# Altium PCB AmplificadorNMOS.PcbDoc
Units mm, origin at the board's own origin, x right, y up, seen from the top; angles counter-clockwise.
Board outline 100 x 100 mm, 2 copper layers (Top Layer, Bottom Layer); 21 components, 9 nets, 40 pads, 0 vias.
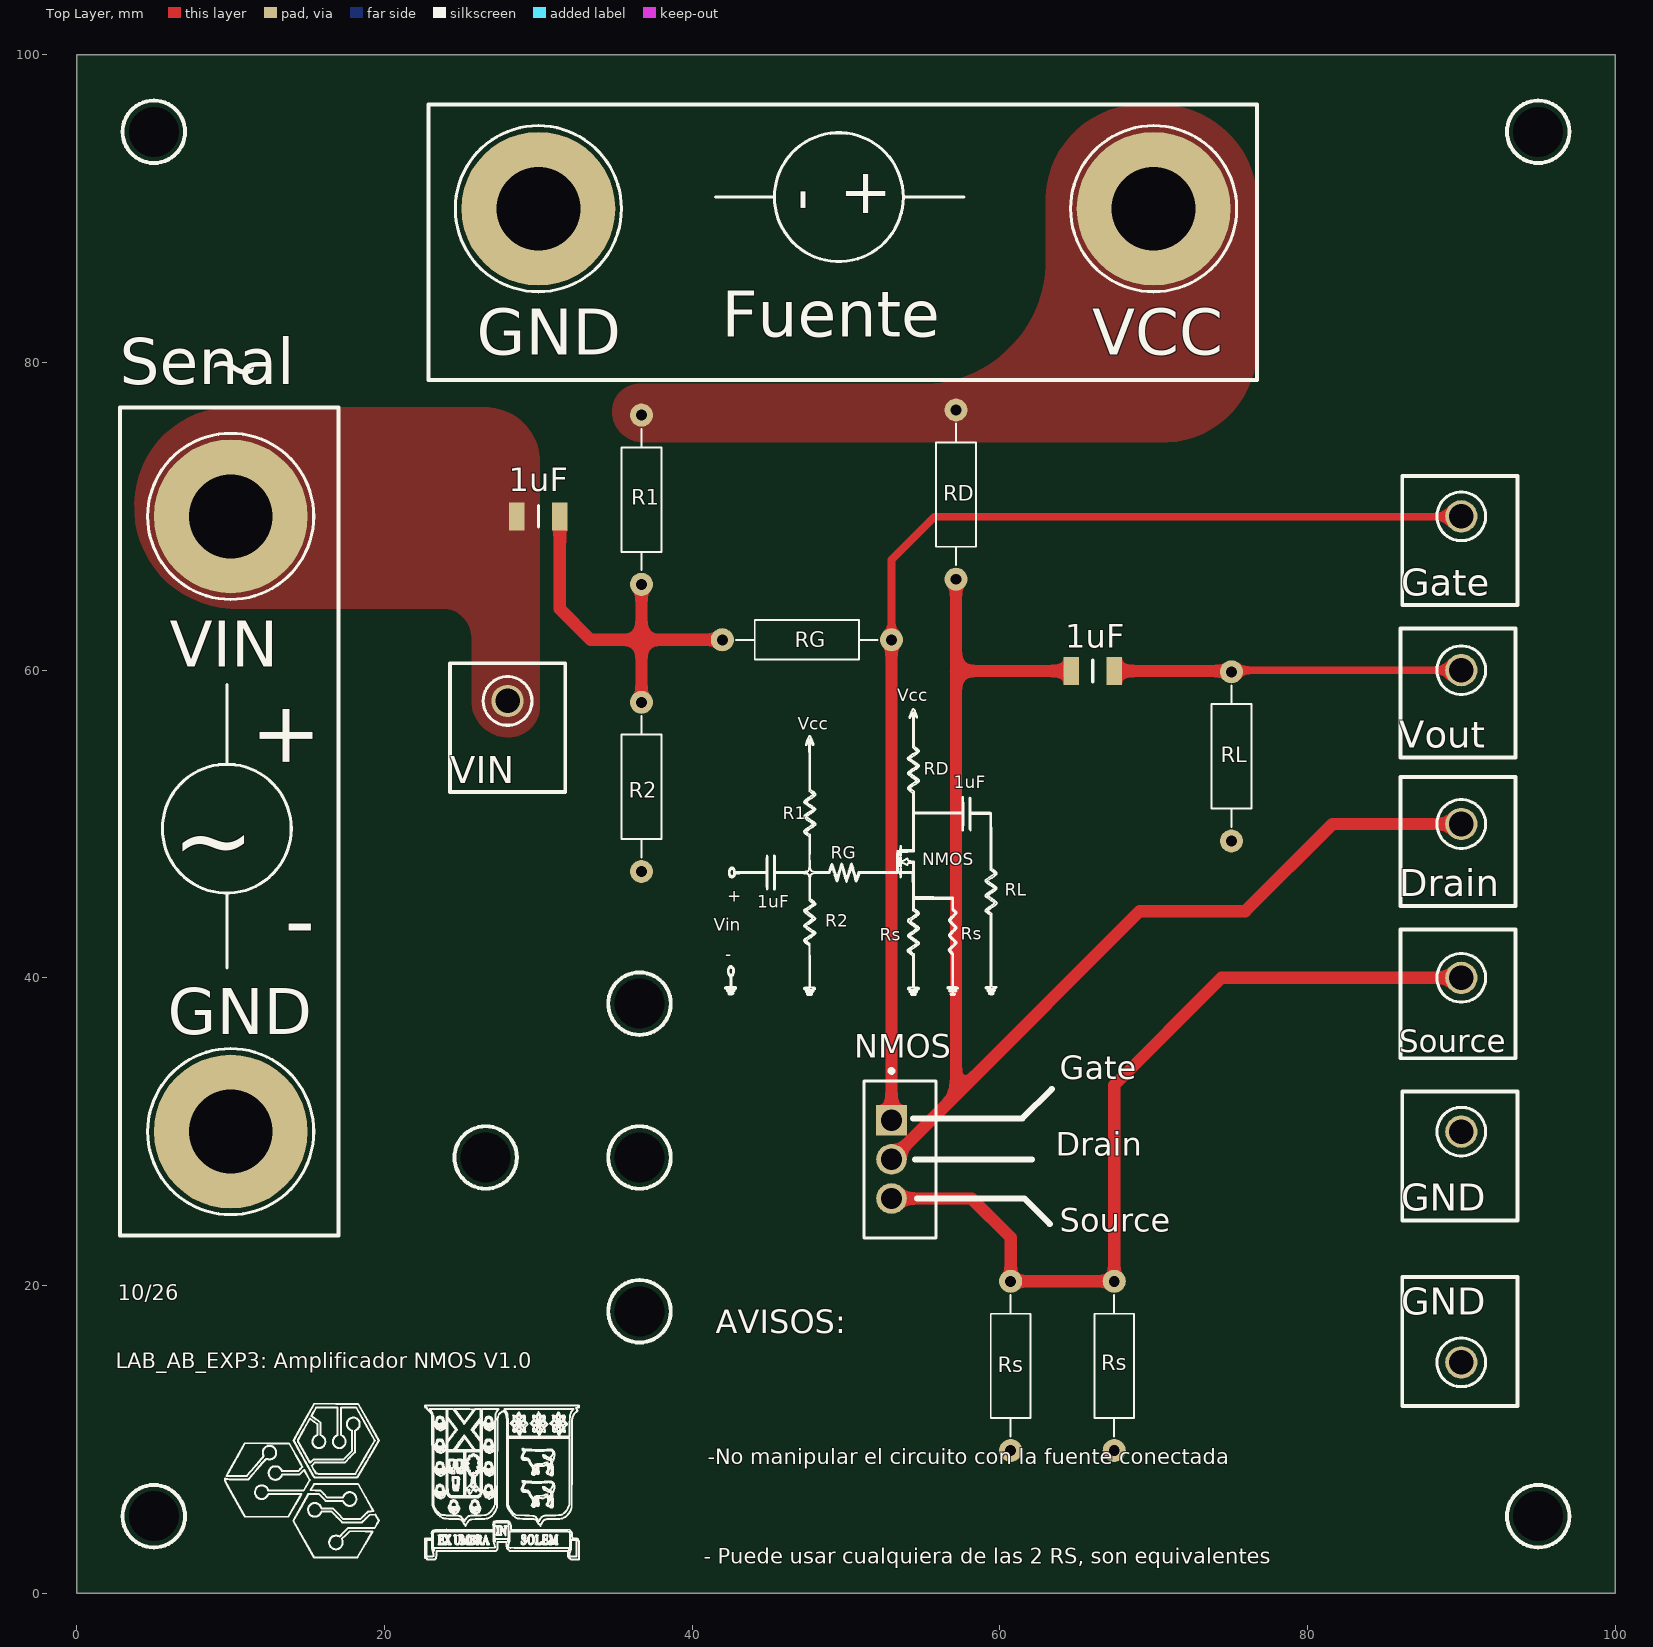
[diagram p0: Top Layer view]
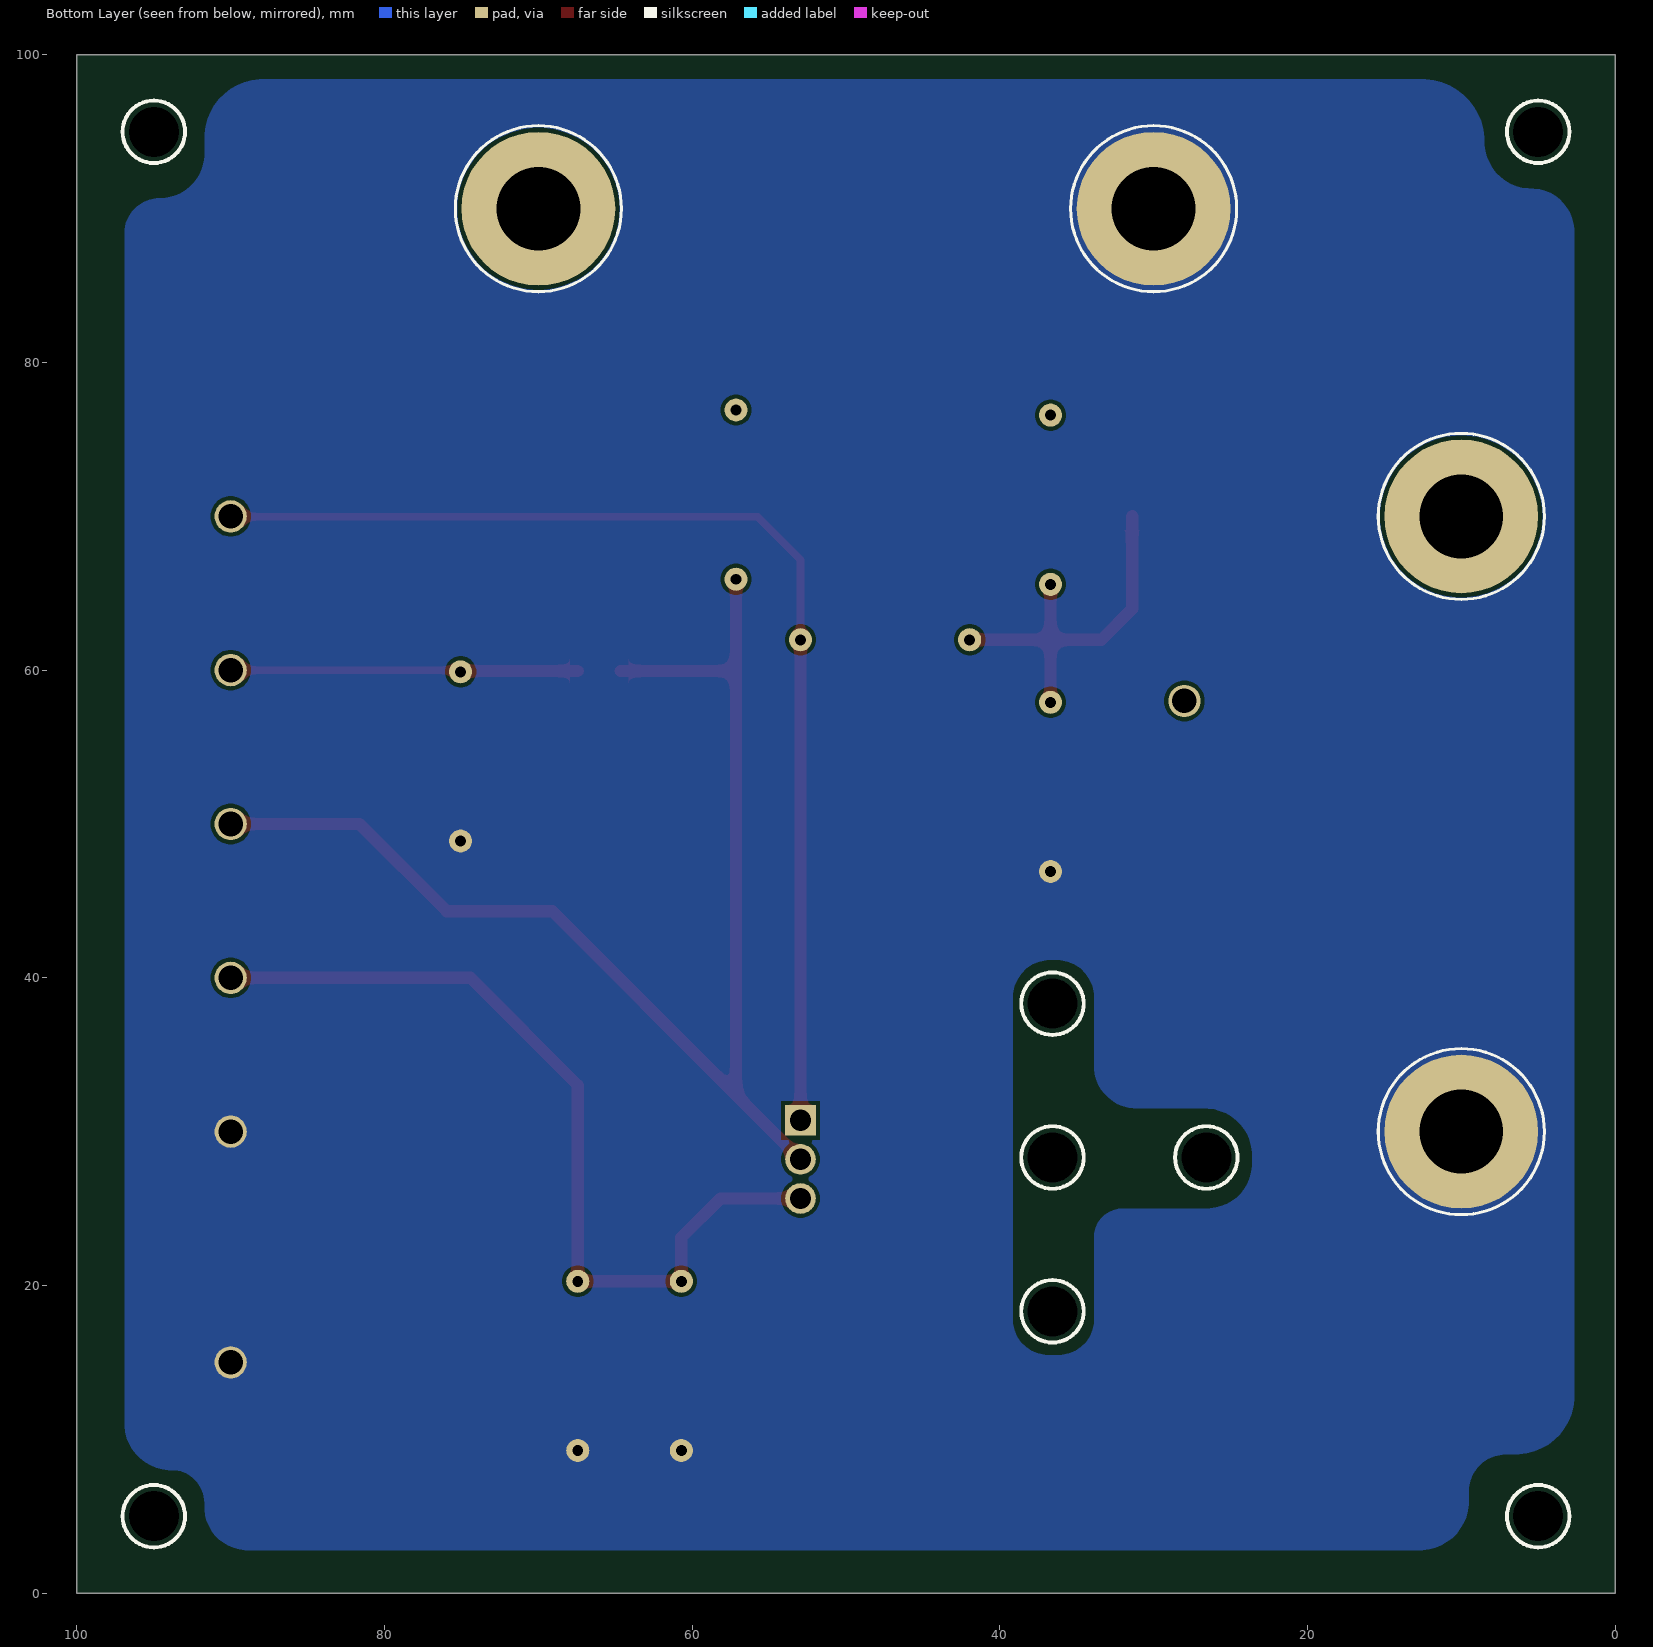
[diagram p1: Bottom Layer view, seen from below]

## Layer stack, top to bottom
Top Solder: solder mask 0.0102, Solder Resist, Dk 3.5
Top Layer: signal copper 0.0356
Dielectric 1: dielectric 0.32, FR-4, Dk 4.8
Bottom Layer: signal copper 0.0356
Bottom Solder: solder mask 0.0102, Solder Resist, Dk 3.5

## Board outline
0,0 100,0 100,100 0,100

## Design rules (kind name [scope] priority, off if disabled: settings)
Clearance [All] p1: gap=0.254 ignorepadtopadclearanceinfootprint=FALSE
PolygonConnect [All] p1: connectstyle=Direct reliefconductorwidth=0.254 reliefentries=4 polygonreliefangle="90 Angle" airgapwidth=0.254
RoutingVias [All] p1: holewidth=0.711 width=1.27 viastyle="Through Hole" minholewidth=0.711 minwidth=1.27 maxholewidth=0.711 maxwidth=1.27
SolderMaskExpansion [All] p1: expansion=0 istentingtop=FALSE
SupplyNets "Schematic Supply Nets_2" [InNet('+VAC')] p1: voltage=0.000
SupplyNets "Schematic Supply Nets_1" [InNet('GND')] p2: voltage=0.000
SupplyNets "Schematic Supply Nets" [InNet('VCC')] p3: voltage=0.000
Width [All] p1: maxlimit=0.254 minlimit=0.254 preferedwidth=0.254
30 further rules are at their usual default settings.

## Components (designator, comment, footprint, x,y, rotation, side; value= is the part's Value field where it differs from the comment)
1uF "C1206C105K3RAC7800" CAPC3216X140N 66.04,59.944 r0 top (schematic designator C5)
1uF "C1206C105K3RAC7800" CAPC3216X140N 30,70 r0 top locked (schematic designator C4)
Drain "5012" KSTN-5012_V 90,50 r270 top locked (schematic designator TP33)
Gate "5014" KSTN-5014_V 90,70 r270 top locked (schematic designator TP34)
GND "5011" KSTN-5011_V 90,30 r270 top locked (schematic designator TP50)
GND "5011" KSTN-5011_V 90,15 r270 top locked (schematic designator TP36)
GND "575-4" KSTN-575-4 30,90 r0 top locked (schematic designator TP30)
GND "575-4" KSTN-575-4 10,30 r0 top locked (schematic designator TP28)
NMOS "IRLZ44N" IFX-PG-TO220-3-904-1 52.959,28.194 r270 top (schematic designator Q2)
R1 "Zocalo_Resistencia_1/4W" Resistencia#1 36.703,76.581 r270 top (schematic designator R7)
R2 "Zocalo_Resistencia_1/4W" Resistencia#1 36.703,57.912 r270 top (schematic designator R3)
RD "Zocalo_Resistencia_1/4W" Resistencia#1 57.15,76.913 r270 top (schematic designator R4)
RG "Zocalo_Resistencia_1/4W" Resistencia#1 41.959,61.976 r0 top (schematic designator R1)
RL "Zocalo_Resistencia_1/4W" Resistencia#1 75.057,59.895 r270 top (schematic designator R5)
Rs "Zocalo_Resistencia_1/4W" Resistencia#1 60.706,20.271 r270 top (schematic designator R6)
Rs "Zocalo_Resistencia_1/4W" Resistencia#2 67.437,20.271 r270 top (schematic designator R2)
Source "5013" KSTN-5013_V 90,40 r270 top locked (schematic designator TP35)
VCC "575-4" KSTN-575-4 70,90 r0 top locked (schematic designator TP29)
VIN "5010" KSTN-5010_V 28,58 r0 top (schematic designator TP31)
VIN "575-4" KSTN-575-4 10,70 r0 top locked (schematic designator TP27)
Vout "5010" KSTN-5010_V 90,60 r270 top locked (schematic designator TP32)

## Footprints (in the part's own frame and the unit in brackets; to place one, negate y for a bottom-side part, rotate by r counter-clockwise, add the part's x,y. Pads: shape width x height; smd on the part's side, far side on the other; paste and mask are expansions set on the pad)
CAPC3216X140N [mm]
  rect 1.02x1.82 smd: 1(-1.4,0) 2(1.4,0)
  silkscreen extent 0,-0.7 0,0.7, body extent -1.83,-0.89 1.57,0.91, height 1.4
IFX-PG-TO220-3-904-1 [mm] "TO,flange mount,2.54 mm pitch, 3 pin, 10.16 mm L X 4.57 mm W X 20.56 mm H body"
  rect 1.99x1.99 hole 1.39 paste-2539.97 mask+0: 1(-2.54,0)
  round 1.99 hole 1.39 paste-2539.97 mask+0: 2(0,0) 3(2.54,0)
  silkscreen extent -5.87,-1.8 5.1,2.9, body extent -5.94,-19.59 5.94,0.25, height 4.41
KSTN-575-4 [mm] "Banana Jack, Non-Insulated, Dia 7.92mm"
  round 10 hole 5.45: 1(0,0)
  silkscreen extent -5.4,-5.4 5.4,5.4, body extent -3.98,-3.96 3.92,3.94, height 2.36
KSTN-5010_V [mm] "Test Point, Dia 3.17mm"
  round 2.1 hole 1.6: 1(0,0)
  silkscreen extent -1.59,-1.58 1.59,1.58, body extent -1.59,-1.59 1.59,1.59, height 8.13
KSTN-5011_V [mm] "Test Point, Dia 3.17mm"
  round 2.1 hole 1.6: 1(0,0)
  silkscreen extent -1.58,-1.59 1.58,1.59, body extent -1.59,-1.59 1.59,1.59, height 8.13
KSTN-5012_V [mm] "Test Point, Dia 3.17mm"
  round 2.1 hole 1.6: 1(0,0)
  silkscreen extent -1.58,-1.59 1.58,1.59, body extent -1.59,-1.59 1.59,1.59, height 8.13
KSTN-5013_V [mm] "Test Point, Dia 3.17mm"
  round 2.1 hole 1.6: 1(0,0)
  silkscreen extent -1.58,-1.59 1.58,1.59, body extent -1.59,-1.59 1.59,1.59, height 8.13
KSTN-5014_V [mm] "Test Point, Dia 3.17mm"
  round 2.1 hole 1.6: 1(0,0)
  silkscreen extent -1.58,-1.59 1.58,1.59, body extent -1.59,-1.59 1.59,1.59, height 8.13
Resistencia#1 [mm]
  round 1.5 hole 0.711: 1(0,0) 2(11,0)
  silkscreen extent 0.89,-1.3 10.08,1.3, body extent -1.27,-1.27 12.27,1.27, height 6.39
Resistencia#2 [mm]
  round 1.5 hole 0.711: 1(0,0) 23(11,0)
  silkscreen extent 0.89,-1.3 10.08,1.3, body extent -1.27,-1.27 12.27,1.27, height 6.39

## Part data
1uF 1uF: "Multilayer Ceramic Capacitors MLCC - SMD/SMT 25V 1uF X7R 1206 10%", Manufacturer_Name="Yageo Group", Mouser Part Number=80-C1206C105K3R7800, Datasheet Link=https://connect.kemet.com:7667/gateway/IntelliData-ComponentDocumentation/1.0/download/specsheet/C1206C105K3RACTU, Geometry.Height=1.4mm, Manufacturer_Part_Number=C1206C105K3RAC7800, Mouser Price/Stock=https://www.mouser.co.uk/ProductDetail/KEMET/C1206C105K3RAC7800?qs=9Bh1%2FLvCqWR5qBTiXKKjKA%3D%3D
Drain: library part CMP-1672-00004-4, "Test Point, White, Through Hole, RoHS, Bulk", Colour=White, Manufacturer=Keystone, Package Quantity=100, ComponentLink1Description="Manufacturer URL", ComponentLink1URL=http://www.keyelco.com/, ComponentLink2Description=Datasheet, ComponentLink2URL=http://www.keyelco.com/product-pdf.cfm?p=1321, Contact Material=Bronze, Contact Plating=Silver, DatasheetVersion="Rev. F, 12/2013", Height="8.12 mm", Length="11.3 mm", Mount="Through Hole", Mounting Technology="Through Hole", PackageDescription="1-Pin Through Hole Device, Dia 3.17 mm", PackageReference=5012, Packaging=Bulk, Pins=1, REACH SVHC="No SVHC", RoHSCompliant=true
Gate: library part CMP-1672-00006-4, "Test Point, Yellow, Through Hole, RoHS, Bulk", Colour=Yellow, Manufacturer=Keystone, Package Quantity=100, ComponentLink1Description="Manufacturer URL", ComponentLink1URL=http://www.keyelco.com/, ComponentLink2Description=Datasheet, ComponentLink2URL=http://www.keyelco.com/product-pdf.cfm?p=1323, Contact Material=Bronze, Contact Plating=Silver, DatasheetVersion="Rev. F, 12/2013", Height="8.12 mm", Mount="Through Hole", Mounting Technology="Through Hole", PackageDescription="1-Pin Through Hole Device, Dia 3.17 mm", PackageReference=5014, Packaging=Bulk, REACH SVHC="No SVHC", RoHSCompliant=true
GND GND: library part CMP-1672-00003-4, "Test Point, Black, Through Hole, RoHS, Bulk", Colour=Black, Manufacturer=Keystone, Package Quantity=100, ComponentLink1Description="Manufacturer URL", ComponentLink1URL=http://www.keyelco.com/, ComponentLink2Description=Datasheet, ComponentLink2URL=http://www.keyelco.com/product-pdf.cfm?p=1320, Contact Material=Bronze, Contact Plating=Silver, DatasheetVersion="Rev. F, 12/2013", Height="8.12 mm", Mount="Through Hole", Mounting Technology="Through Hole", PackageDescription="1-Pin Through Hole Device, Dia 3.17 mm", PackageReference=5011, Packaging=Bulk, Pins=1, REACH SVHC="No SVHC", RoHSCompliant=true
GND GND VCC VIN: library part CMP-2000-05649-1, "Banana Jack, Non-Insulated, 1-Pin THD, RoHS, Bulk", Color=-, Manufacturer=Keystone-Electronics, Package Description="1-Pin Through Hole Device, Dia 7.92 mm", Package Version="Rev. B, 11/1994", Body Material=-, Category=Connectors,Interconnects, Contact Finish=Nickel, Contact Material=Brass, Datasheet URL=http://www.keyelco.com/product-pdf.cfm?p=2379, Datasheet Version="Rev. B, 11/1994", Family=BananaandTipConnectors-Jacks,Plugs, Features=-, Gender=Female, Insulation=Non-Insulated, Manufacturer URL=http://www.keyelco.com/, Mounting Technology=ThroughHole, Mounting Type=ThroughHole, Operating Temperature=-, Package Reference=575-4, Package URL=http://www.keyelco.com/product-pdf.cfm?p=2379, Packaging=Bulk, Plug/Mating Plug Diameter=StandardBanana, Series=-, Termination=Solder, Type=BananaJack, Wire Gauge=-
NMOS: "OptiMOS 3 Power-Transistor, VDS 100V", Manufacturer="Infineon Technologies", Manufacturer Order Number=IRLZ44N, PackageReference=PG-TO220-3-904
R1 R2 RD RG RL Rs Rs: "1.07 kOhms Â±1% 0.25W, 1/4W Through Hole Resistor Axial - Metal Film", Package="RADIAL-2 YAGEO", Check_prices=https://www.snapeda.com/parts/MFR-25FBF52-1K/Yageo/view-part/?ref=eda, MF=Yageo, MP=MFR-25FBF52-1K, SnapEDA_Link=https://www.snapeda.com/parts/MFR-25FBF52-1K/Yageo/view-part/?ref=snap
Source: library part CMP-1672-00005-4, "Test Point, Orange, Through Hole, RoHS, Bulk", Colour=Orange, Manufacturer=Keystone, Package Quantity=100, ComponentLink1Description="Manufacturer URL", ComponentLink1URL=http://www.keyelco.com/, ComponentLink2Description=Datasheet, ComponentLink2URL=http://www.keyelco.com/product-pdf.cfm?p=1322, Contact Material=Bronze, Contact Plating=Silver, DatasheetVersion="Rev. F, 12/2013", Height="8.12 mm", Mount="Through Hole", Mounting Technology="Through Hole", PackageDescription="1-Pin Through Hole Device, Dia 3.17 mm", PackageReference=5013, Packaging=Bulk, REACH SVHC="No SVHC", RoHSCompliant=True
VIN Vout: library part CMP-1672-00002-4, "Test Point, Red, Through Hole, RoHS, Bulk", Colour=Red, Manufacturer=Keystone, Package Quantity=100, ComponentLink1Description="Manufacturer URL", ComponentLink1URL=http://www.keyelco.com/, ComponentLink2Description=Datasheet, ComponentLink2URL=http://www.keyelco.com/product-pdf.cfm?p=1319, Contact Material=Bronze, Contact Plating=Silver, DatasheetVersion="Rev. F, 12/2013", Height="8.12 mm", Mount="Through Hole", Mounting Technology="Through Hole", PackageDescription="1-Pin Through Hole Device, Dia 3.17 mm", PackageReference=5010, Packaging=Bulk, Pins=1, REACH SVHC="No SVHC", RoHSCompliant=true

## Free pads (board coordinates)
  round 0 hole 3.25: 11(5,5) 11(5,95) 11(26.576,28.321) 11(36.576,18.321) 11(36.576,28.321) 11(36.576,38.321) 11(95,5) 11(95,95)

## Nets (pads, with @x,y where several pads share a name; then routed paths per layer and width w, separated by ;. In a path a pad name is that pad's centre, name@x,y a point inside that pad or via, vN(x,y) a via of type N, cw(c..) or ccw(c..) an arc to the next point about the centre after c; other vN are vias at no path point)
+VAC: 1uF.1@28.6,70 VIN.1
Center: 1uF.2@31.4,70 R1.2 R2.1 RG.1 | length 25.1
  Top Layer w0.8: 1uF.2@31.4,70 31.4,63.977 33.401,61.976 36.703,61.976 ; R2.1 36.703,61.976 ; R1.2 36.703,61.976 ; RG.1 36.703,61.976
Drain: 1uF.1@64.64,59.944 Drain.1 NMOS.2 RD.2 | length 87.1
  Top Layer w0.8: NMOS.2 57.15,32.385 ; RD.2 57.15,59.944 ; 1uF.1@64.64,59.944 57.15,59.944 ; Drain.1 81.623,50 75.946,44.323 69.088,44.323 57.15,32.385 ; 57.15,32.385 57.15,59.944
Gate: Gate.1 NMOS.1 RG.2 | length 74.6
  Top Layer w0.5: RG.2 52.959,67.183 55.753,69.977 Gate.1@90,69.977
  Top Layer w0.8: NMOS.1 RG.2
GND: GND.1 R2.2 RL.2 Rs.2 Rs.23
NetC2_1: 
Out: 1uF.2@67.44,59.944 RL.1 Vout.1 | length 22.6
  Top Layer w0.5: RL.1 75.162,60 Vout.1
  Top Layer w0.8: 1uF.2@67.44,59.944 RL.1@75.008,59.944
Source: NMOS.3 Rs.1 Source.1 | length 56.6
  Top Layer w0.8: NMOS.3 58.166,25.654 60.706,23.114 60.706,20.271 67.437,20.271 67.437,33.02 74.417,40 Source.1
VCC: R1.1 RD.1 VCC.1

## Polygon pours and split planes (outlines as drawn)
VCC on Top Layer "VCC_L01_P003" (solid, pour order 3): 70.612,74.803 36.83,74.803 cw(c36.83,76.835) 34.798,76.835 cw(c36.576,76.835) 36.576,78.613 54.991,78.613 ccw(c54.991,86.614) 62.992,86.614 62.992,90.551 cw(c69.215,90.551) 69.215,96.774 70.358,96.774 cw(c70.358,90.424) 76.708,90.424 76.708,80.899 cw(c70.612,80.899)
+VAC on Top Layer "+VAC_L01_P000" (solid, pour order 0): 10.287,64.008 23.749,64.008 cw(c23.749,62.103) 25.654,62.103 25.654,58.039 ccw(c28.067,58.039) 28.067,55.626 ccw(c28.067,57.658) 30.099,57.658 30.099,73.533 ccw(c26.543,73.533) 26.543,77.089 9.906,77.089 ccw(c10.096,70.739) 3.746,70.548 ccw(c10.287,70.548)
GND on Bottom Layer "GND_L02_P004" (solid, pour order 4): 9.525,6.604 9.525,5.969 ccw(c12.7,5.969) 12.7,2.794 88.9,2.794 ccw(c88.9,5.588) 91.694,5.588 91.694,5.842 cw(c93.853,5.842) 93.853,8.001 ccw(c93.853,11.049) 96.901,11.049 96.901,88.392 ccw(c94.615,88.392) 94.615,90.678 cw(c94.615,93.599) 91.694,93.599 91.694,94.615 ccw(c87.884,94.615) 87.884,98.425 12.573,98.425 ccw(c12.573,94.361) 8.509,94.361 cw(c5.461,94.361) 5.461,91.313 ccw(c5.461,88.519) 2.667,88.519 2.667,12.827 ccw(c6.477,12.827) 6.477,9.017 7.112,9.017 cw(c7.112,6.604)

## Other copper
Bottom Layer:
  pour cut-out: 26.543,25.019 32.004,25.019 cw(c32.004,23.114) 33.909,23.114 33.909,17.78 ccw(c36.195,17.78) 36.195,15.494 36.83,15.494 ccw(c36.83,17.78) 39.116,17.78 39.116,38.735 ccw(c36.703,38.735) 36.703,41.148 36.322,41.148 ccw(c36.322,38.735) 33.909,38.735 33.909,34.29 cw(c31.115,34.29) 31.115,31.496 26.67,31.496 ccw(c26.67,28.448) 23.622,28.448 23.622,27.94 ccw(c26.543,27.94)

## Silkscreen, mask and mechanical layers (free items; w line width, h text height)
Top Overlay:
  drawing of 26129 lines, arcs and shapes, not listed
  text "+" at 53.001,92.245 h3 r180
  text "-" at 48.328,89.85 h3 r90
  text "Fuente" at 41.91,81.661 h3
  text "~" at 8.232,78.784 h3 r346.5
  text "Senal" at 2.794,78.597 h3
  text "+" at 11.899,58.047 h4 r270
  text "Vcc" at 53.343,57.981 h0.8
  text "Vcc" at 46.863,56.134 h0.8
  text "RD" at 55.063,53.206 h0.8
  text "1uF" at 57.006,52.319 h0.8
  text "~" at 11.557,52.247 h8 r180
  text "R1" at 45.887,50.322 h0.8
  text "RG" at 49.022,47.752 h0.8
  text "NMOS" at 54.956,47.322 h0.8
  text "RL" at 60.325,45.339 h0.8
  text "+" at 42.291,44.952 h0.8
  text "-" at 15.502,44.806 h4 r180
  text "1uF" at 44.215,44.567 h0.8
  text "R2" at 48.641,43.307 h0.8
  text "Vin" at 41.402,43.053 h0.8
  text "Rs" at 57.473,42.464 h0.8
  text "Rs" at 52.197,42.418 h0.8
  text "-" at 42.164,41.129 h0.8
  text "Gate" at 63.881,33.401 h1.52
  text "Drain" at 63.627,28.448 h1.52
  text "Source" at 63.881,23.495 h1.52
  text "10/26" at 2.667,19.05 h1
  text "AVISOS:" at 41.529,16.891 h1.52
  text "LAB_AB_EXP3: Amplificador NMOS V1.0" at 2.54,14.605 h1
  text "-No manipular el circuito con la fuente conectada" at 41.021,8.382 h1
  text "- Puede usar cualquiera de las 2 RS, son equivalentes" at 40.767,1.905 h1
Bottom Overlay:
  circle w0.254: c36.576,28.321 r2.031
  circle w0.254: c36.576,38.321 r2.031
  circle w0.254: c26.576,28.321 r2.031
  circle w0.254: c36.576,18.321 r2.031
  circle w0.254: c5,5 r2.031
  circle w0.254: c95,5 r2.031
  circle w0.254: c95,95 r2.031
  circle w0.254: c5,95 r2.031